# Altium PCB PCB1.pcbdoc
Units mil, origin at the board's own origin, x right, y up, seen from the top; angles counter-clockwise.
Board outline 2895 x 2260.39 mil, 2 copper layers (Top Layer, Bottom Layer); 9 components, 7 nets, 21 pads, 0 vias.
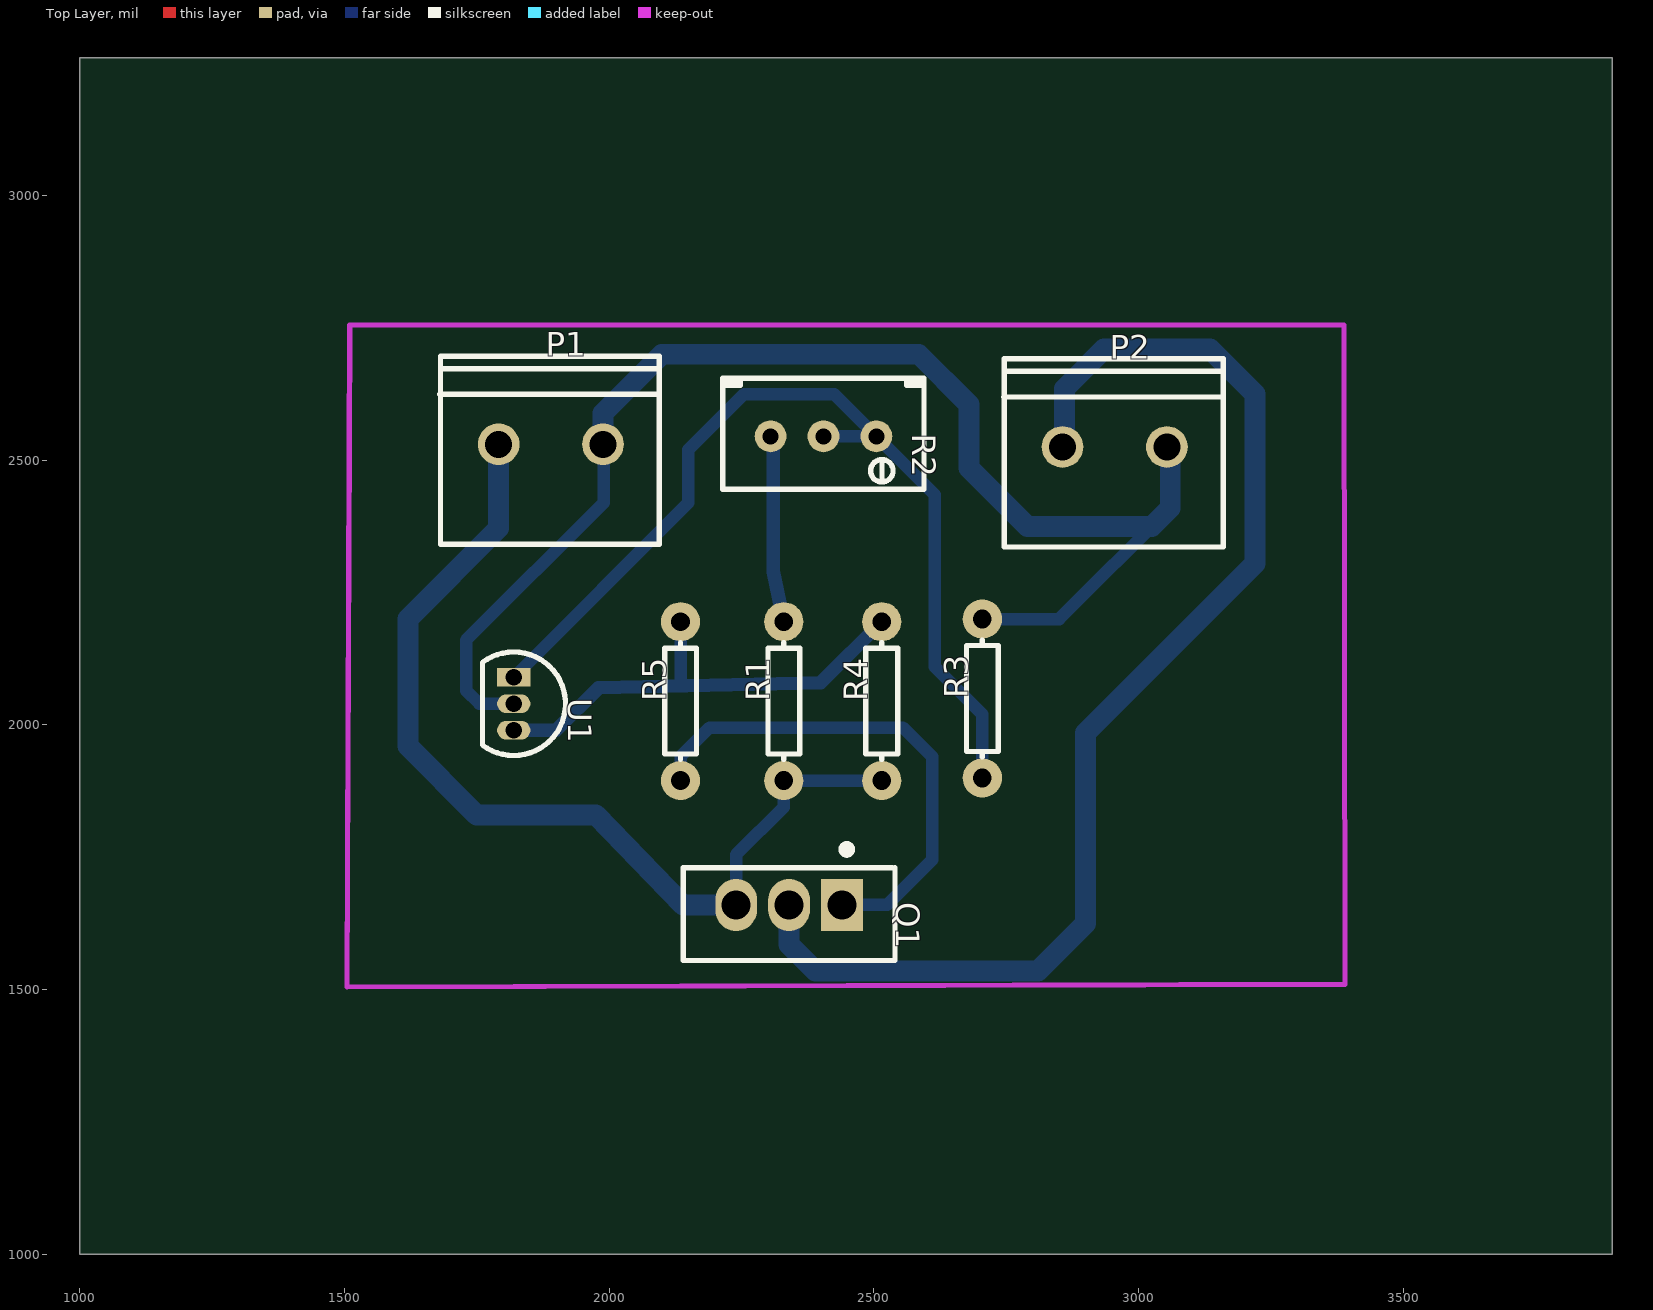
[diagram p0: Top Layer view]
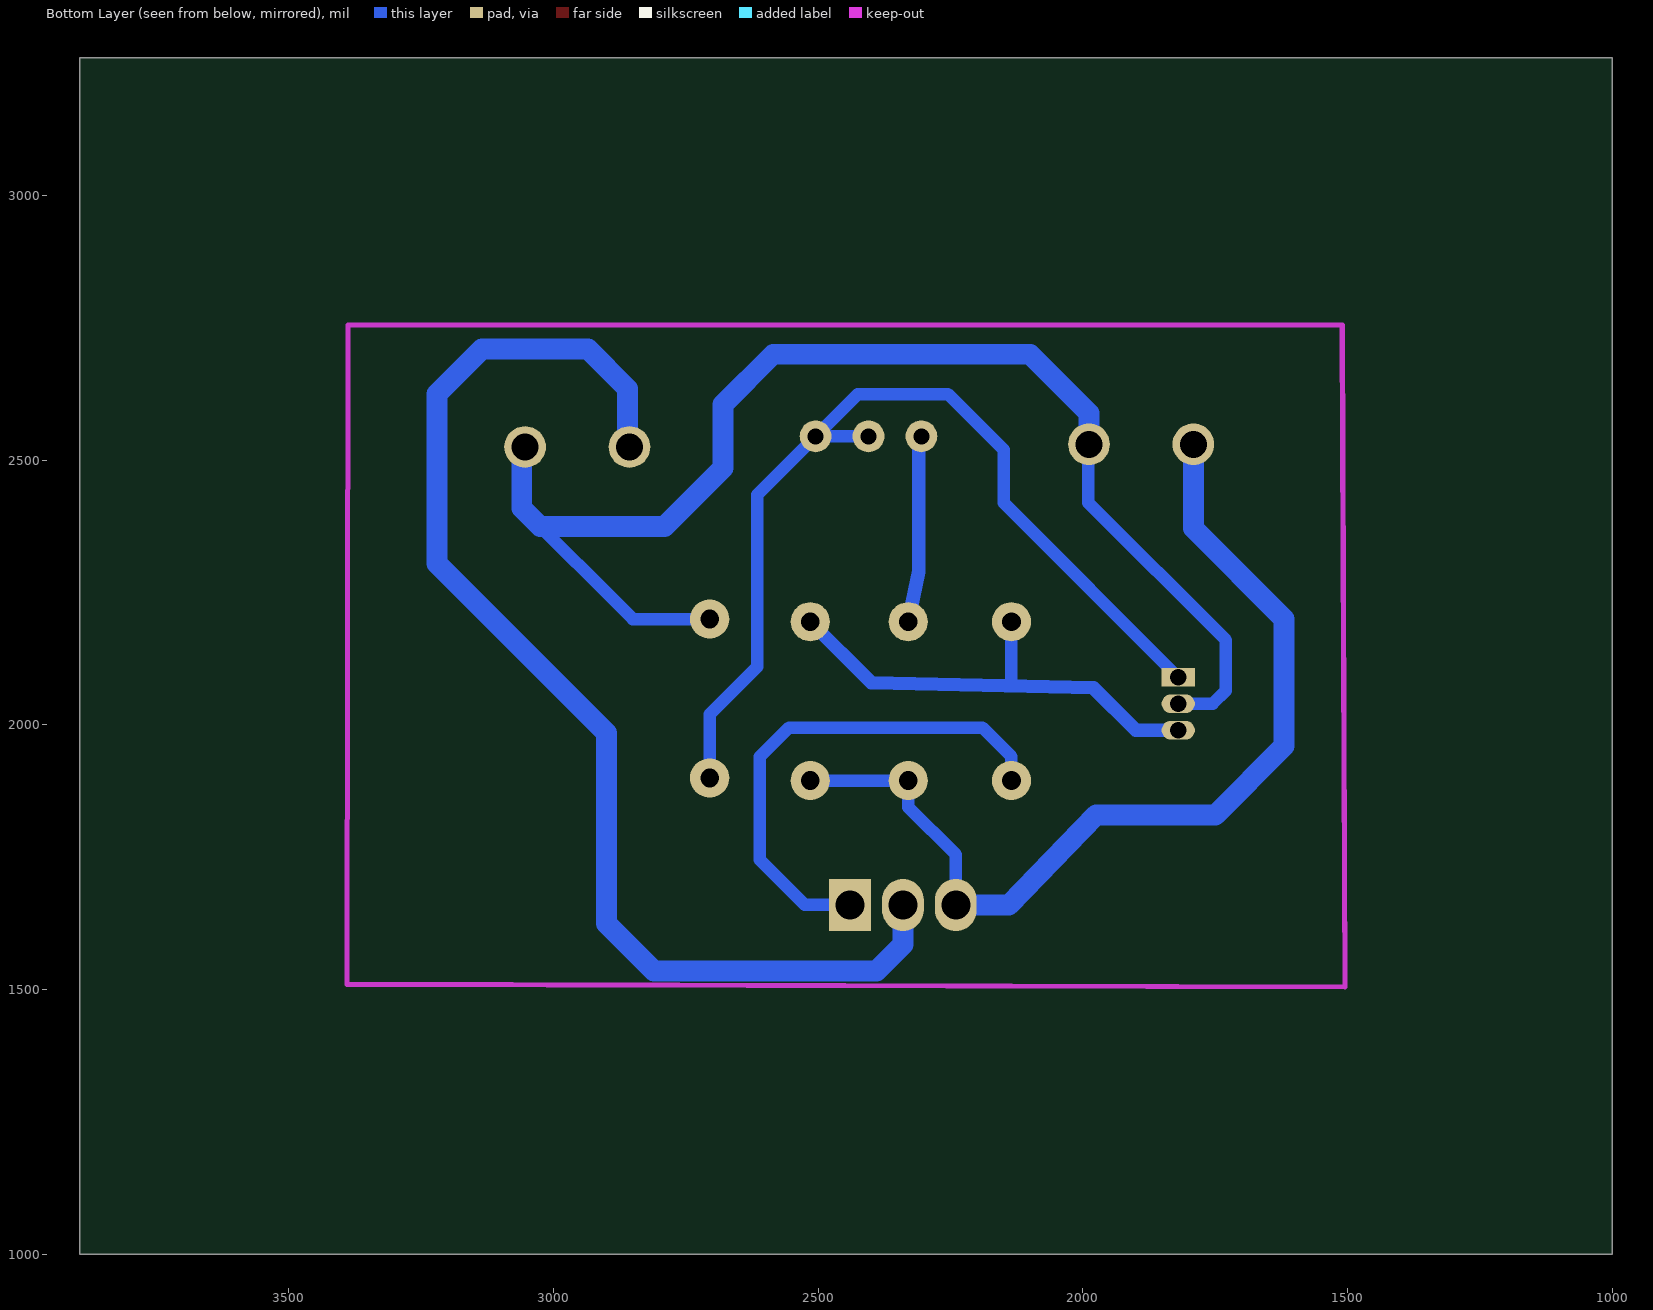
[diagram p1: Bottom Layer view, seen from below]

## Layer stack, top to bottom
Top Solder: solder mask 0.4, Solder Resist, Dk 3.5
Top Layer: signal copper 1.4
Dielectric1: dielectric 12.6, FR-4, Dk 4.8
Bottom Layer: signal copper 1.4
Bottom Solder: solder mask 0.4, Solder Resist, Dk 3.5

## Board outline
3895,1000 1000,1000 1000,3260.39 3895,3260.39

## Design rules (kind name [scope] priority, off if disabled: settings)
Clearance [All] p1: gap=10 ignorepadtopadclearanceinfootprint=FALSE
PolygonConnect [All] p1: connectstyle=Relief reliefconductorwidth=10 reliefentries=4 polygonreliefangle="90 Angle" airgapwidth=10
RoutingVias [All] p1: holewidth=28 width=50 viastyle="Through Hole" minholewidth=28 minwidth=50 maxholewidth=28 maxwidth=50
SolderMaskExpansion [All] p1: expansion=0 istentingtop=FALSE
Width [All] p1: maxlimit=10 minlimit=10 preferedwidth=10
30 further rules are at their usual default settings.

## Components (designator, comment, footprint, x,y, rotation, side; value= is the part's Value field where it differs from the comment)
P1 "CONN-TH_2P-P5.00" CONN-TH_2P-P5.00 1890,2530 r0 top
P2 "CONN-TH_2P-P5.00" CONN-TH_2P-P5.00 2955,2525 r0 top
Q1 "TIP42C" TO-220-3_L10.0-W4.5-P2.54-T 2340,1660 r270 top
R1 "82k" AXIAL-0.3 2330,2045 r90 top
R2 "20kΩ" RES-ADJ-TH_3296W 2405,2545 r270 top
R3 "20k" AXIAL-0.3 2705,2050 r90 top
R4 "1k" AXIAL-0.3 2515,2045 r90 top
R5 "1k" AXIAL-0.3 2135,2045 r90 top
U1 "TL431CLP" TO-92-3_L4.9-W3.7-P1.27-L 1820,2040 r270 top

## Footprints (in the part's own frame and the unit in brackets; to place one, negate y for a bottom-side part, rotate by r counter-clockwise, add the part's x,y. Pads: shape width x height; smd on the part's side, far side on the other; paste and mask are expansions set on the pad)
AXIAL-0.3 [mil]
  round 74 hole 35.4 paste-99999 mask+2: 1(-150,0) 2(150,0)
  silkscreen extent -110,-30 110,30
CONN-TH_2P-P5.00 [mm]
  round 2 hole 1.3 paste-2539.97 mask+0.051: 1(-2.504,0) 2(2.504,0)
  silkscreen extent -5.32,-4.8 5.21,4.23
RES-ADJ-TH_3296W [mil]
  round 60 hole 30 paste-99999 mask+2: 1(0,100.01) 2(0,0.01) 3(0,-99.99)
  silkscreen extent -110,-190 100,190
TO-92-3_L4.9-W3.7-P1.27-L [mm]
  rect 0.9x1.6 hole 0.8 paste-2539.97 mask+0.051: 1(-1.27,0)
  oval 0.9x1.6 hole 0.8 paste-2539.97 mask+0.051: 2(0,0) 3(1.27,0)
  silkscreen extent -2.48,-1.5 2.48,2.48
TO-220-3_L10.0-W4.5-P2.54-T [mm]
  rect 2.5x2 hole 1.4 paste-2539.97 mask+0.051: 1(0,2.54)
  oval 2.5x2 hole 1.4 paste-2539.97 mask+0.051: 2(0,0) 3(0,-2.54)
  silkscreen extent -2.86,-5.08 2.67,5.08

## Nets (pads, with @x,y where several pads share a name; then routed paths per layer and width w, separated by ;. In a path a pad name is that pad's centre, name@x,y a point inside that pad or via, vN(x,y) a via of type N, cw(c..) or ccw(c..) an arc to the next point about the centre after c; other vN are vias at no path point)
GND: P1.2 P2.2 R3.2 U1.2 | length 2746.5
  Bottom Layer w23.62: U1.2 1755,2040 1730,2065 1730,2160 1990,2420 1990,2528.6 P1.2 ; R3.2 2850,2200 3060,2410 3060,2518.6 P2.2
  Bottom Layer w39.37: P1.2 1988.6,2588.6 2100,2700 2585,2700 2680,2605 2680,2485 2790,2375 3025,2375 3060,2410 3060,2518.6 P2.2
Q1_1: Q1.1 R5.1 | length 965.8
  Bottom Layer w23.62: R5.1 2135,1940 2190,1995 2555,1995 2610,1940 2610,1745 2525,1660 Q1.1
Q1_2: P2.1 Q1.2 | length 2363.3
  Bottom Layer w39.37: Q1.2 2340,1585 2390,1535 2810,1535 2900,1625 2900,1985 3220,2305 3220,2625 3135,2710 2935,2710 2860,2635 2860,2528.6 P2.1
R2_3: R1.2 R2.3 | length 354.2
  Bottom Layer w25.75: R2.3 2310,2540 2310,2290 R1.2
U1_1: R2.1 R2.2 R3.1 U1.1 | length 1826.2
  Bottom Layer w23.62: U1.1 2150,2420 2150,2520 2255,2625 2425,2625 R2.1 ; R2.2 R2.1 ; R3.1 2705,2020 2615,2110 2615,2435 R2.1
U1_3: R4.2 R5.2 U1.3 | length 911.5
  Bottom Layer w23.62: 2135,2073.51 R5.2
  Bottom Layer w25.75: U1.3 1900,1990 1980,2070 2400,2080 R4.2 ; R5.2@2125,2185 R5.2
VCC: P1.1 Q1.3 R1.1 R4.1 | length 1844
  Bottom Layer w23.62: Q1.3 2240,1755 2330,1845 R1.1 R4.1
  Bottom Layer w39.37: P1.1 1791.4,2371.4 1620,2200 1620,1960 1750,1830 1975,1830 2140,1660 Q1.3